# Altium PCB Keyb_ESP32_simple.PcbDoc (part 1 of 2)
Units mm, origin at the board's own origin, x right, y up, seen from the top; angles counter-clockwise.
Board outline 160.13 x 101 mm, 2 copper layers (Top Layer, Bottom Layer), stack 1.181 mm thick; 132 components, 118 nets, 620 pads, 274 vias.
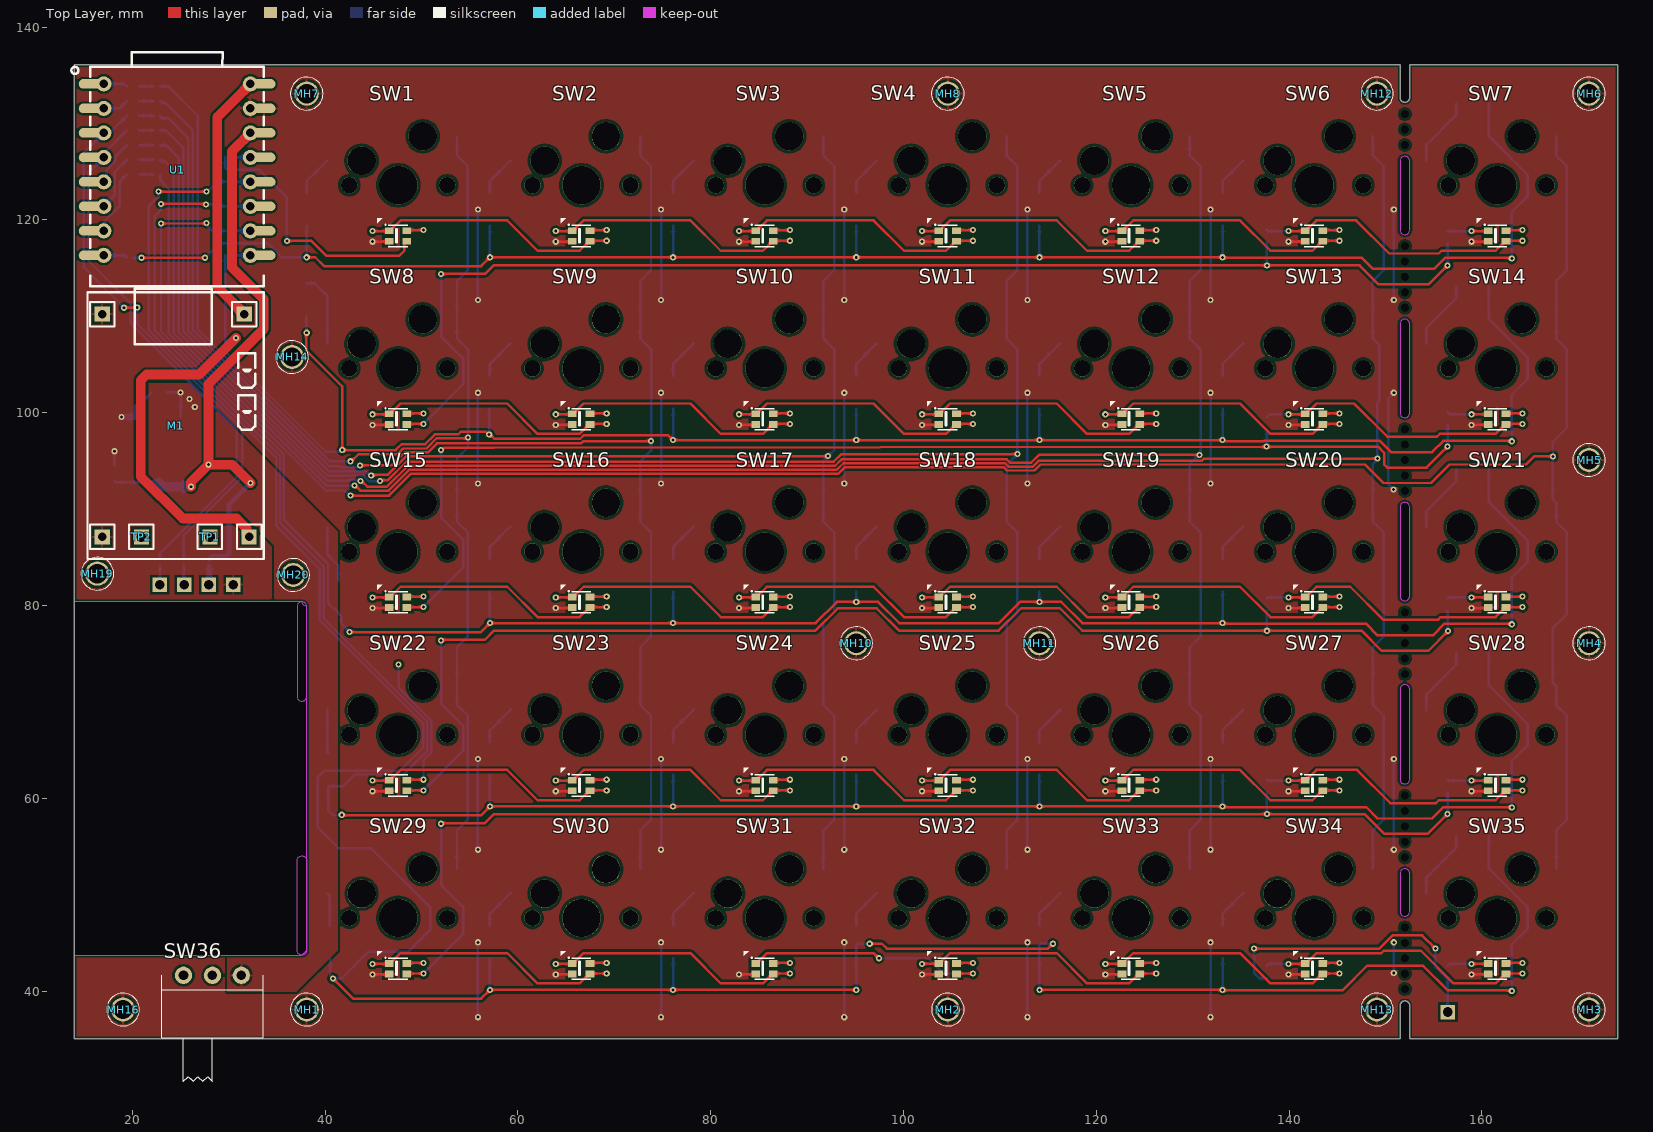
[diagram p0: Top Layer view]
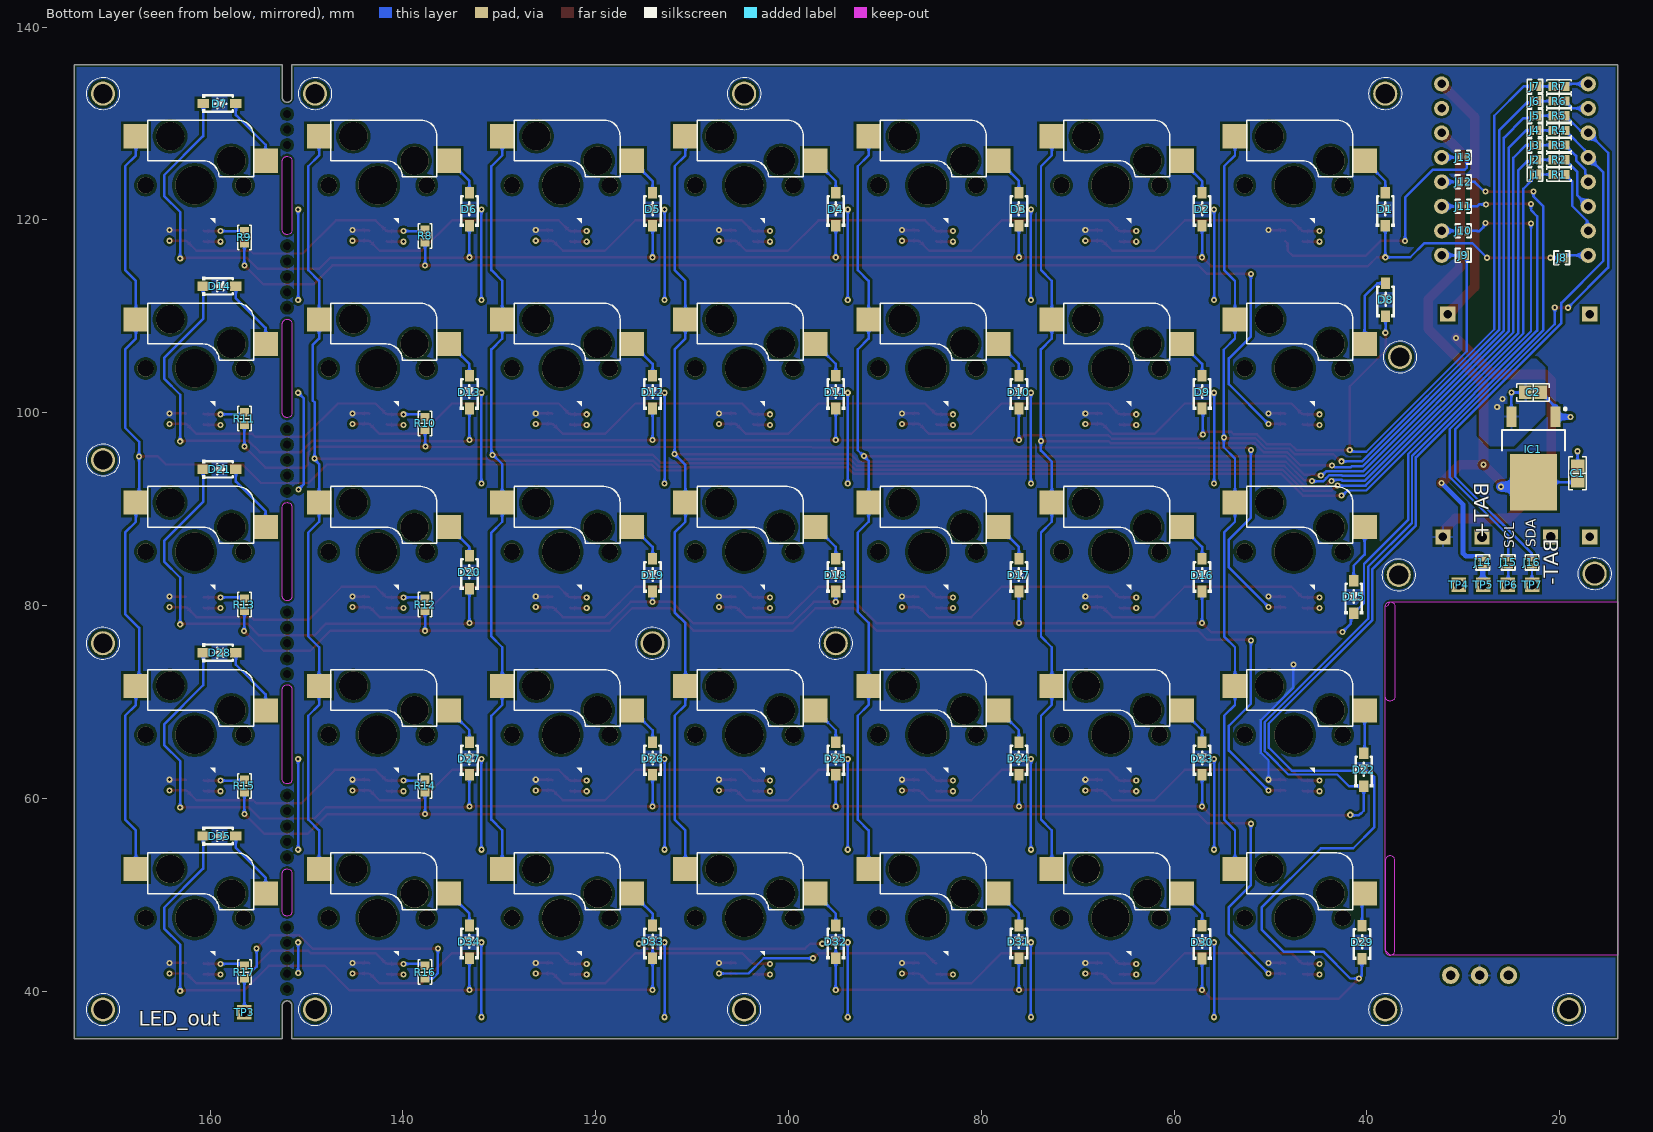
[diagram p1: Bottom Layer view, seen from below]
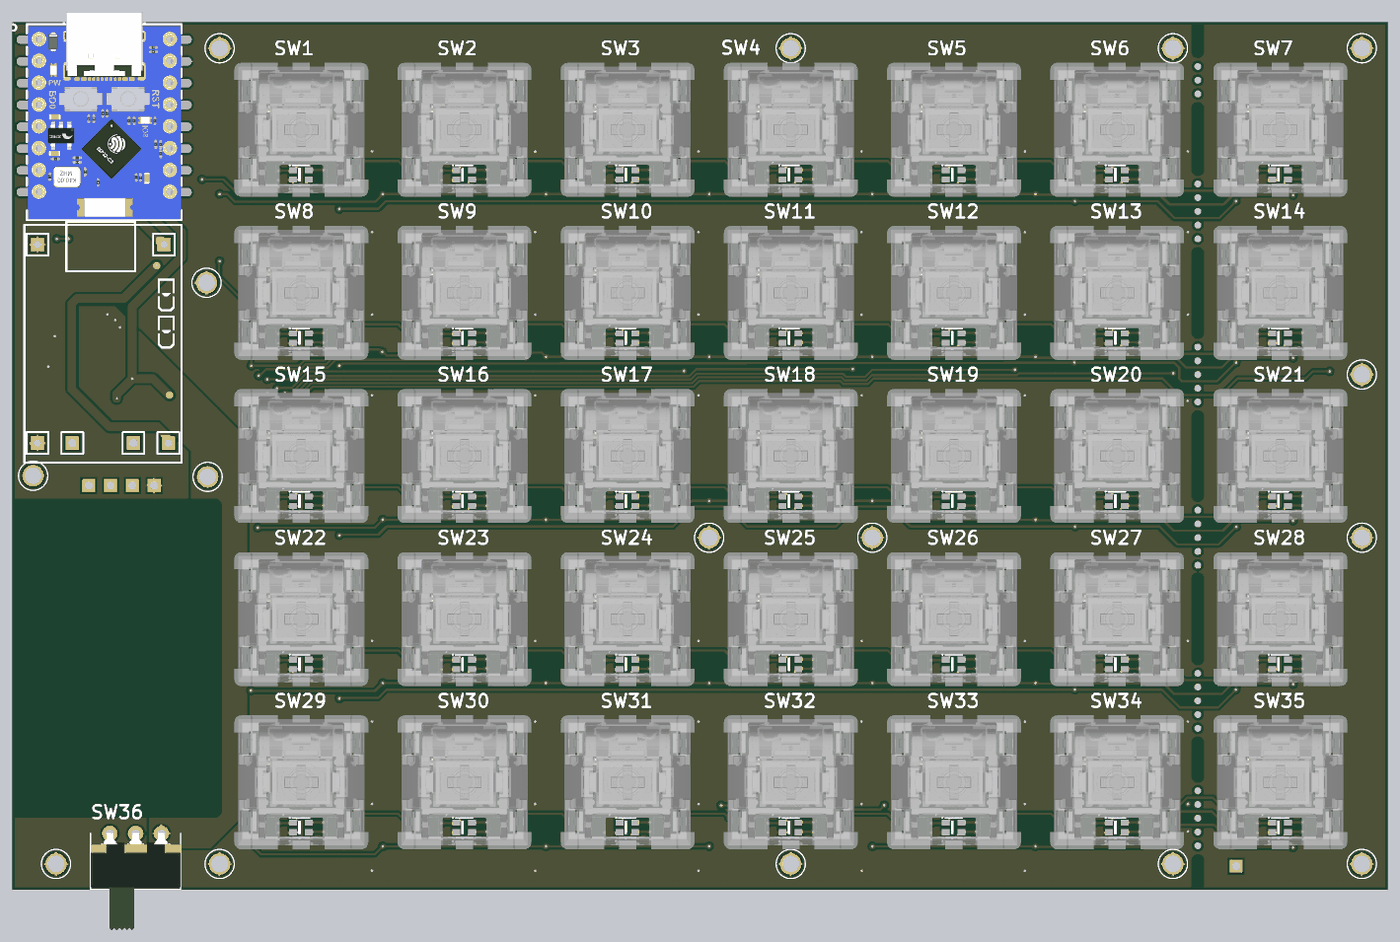
[diagram p3: 3D render of the assembled board from above, using the file's embedded part models]

## Layer stack, top to bottom
Top Solder: solder mask 0.0102, Solder Resist, Dk 3.5
Top Layer: signal copper 0.0356
Dielectric 1: dielectric 1.11, FR-4, Dk 4.8
Bottom Layer: signal copper 0.0356
Bottom Solder: solder mask 0.0102, Solder Resist, Dk 3.5

## Board outline
13.97,35.1 151.5,35.1 151.5,38.5 cw(c152,38.5) 152.5,38.5 152.5,35.1 174.1,35.1 174.1,136.1 152.5,136.1 152.5,132.7 cw(c152,132.7) 151.5,132.7 151.5,136.1 13.97,136.1
cut-out: 37.1,53.556 cw(c37.591,53.556) 37.591,54.047 cw(c37.591,53.538) 38.1,53.538 38.1,44.25 cw(c37.6,44.247) 37.596,43.747 cw(c37.591,44.238) 37.1,44.238 37.1,44.247
cut-out: 37.1,70.576 ccw(c37.591,70.574) 37.591,70.083 ccw(c37.591,70.592) 38.1,70.592 38.1,79.883 ccw(c37.6,79.883) 37.596,80.383 ccw(c37.591,79.892) 37.1,79.892
cut-out: 151.5,99.991 ccw(c151.991,99.991) 151.991,99.5 152,99.5 ccw(c152,100) 152.5,100 152.5,109.2 ccw(c152,109.2) 152,109.7 151.991,109.7 ccw(c151.991,109.209) 151.5,109.209
cut-out: 151.5,80.991 ccw(c151.991,80.991) 151.991,80.5 ccw(c151.991,81.009) 152.5,81.009 152.5,90.2 ccw(c152,90.2) 152,90.7 151.991,90.7 ccw(c151.991,90.209) 151.5,90.209 151.5,90.2
cut-out: 151.5,61.991 ccw(c151.991,61.991) 151.991,61.5 ccw(c151.991,62.009) 152.5,62.009 152.5,71.3 ccw(c152,71.3) 152,71.8 151.991,71.8 ccw(c151.991,71.309) 151.5,71.309 151.5,71.3
cut-out: 151.5,48.291 ccw(c151.991,48.291) 151.991,47.8 ccw(c151.991,48.309) 152.5,48.309 152.5,52.2 ccw(c152,52.2) 152,52.7 151.991,52.7 ccw(c151.991,52.209) 151.5,52.209
cut-out: 151.5,118.968 ccw(c151.991,118.968) 151.991,118.477 ccw(c151.991,118.986) 152.5,118.986 152.5,126.091 ccw(c152,126.091) 152,126.591 151.991,126.591 ccw(c151.991,126.1) 151.5,126.1
cut-out: 38.092,79.886 37.77,80.035 37.587,80.391 13.978,80.383 13.97,80.391 13.97,43.739 37.587,43.739 38.092,44.244

## Design rules (kind name [scope] priority, off if disabled: settings)
BoardOutlineClearance [All] p1: gap=0.254 ignorepadtopadclearanceinfootprint=FALSE except(0: Arc-SplitContinuation Track-SplitContinuation SMDPad-SplitContinuation THPad-SplitContinuation Via-SplitContinuation Fill-SplitContinuation Poly-SplitContinuation Region-SplitContinuation Text-SplitContinuation)
Clearance [All] p1: gap=0.254 ignorepadtopadclearanceinfootprint=FALSE except(0.152: Arc-Arc Arc-Track Arc-THPad Arc-Via Arc-Text Track-Track Track-THPad Track-Via Track-Text SMDPad-SMDPad SMDPad-THPad SMDPad-Via SMDPad-Text THPad-THPad THPad-Via THPad-Text Via-Via Via-Text Fill-Text Poly-Text Region-Text Text-Text; 0.203: Arc-SMDPad Track-SMDPad; 0.305: Arc-Hole Track-Hole SMDPad-Hole THPad-Hole Via-Hole Fill-Hole Poly-Hole Region-Hole Text-Hole)
PolygonConnect [All] p1: thpad.connectstyle=Relief thpad.reliefconductorwidth=0.254 thpad.reliefentries=4 thpad.polygonreliefangle="90 Angle" thpad.airgapwidth=0.254 smdpad.connectstyle=Relief smdpad.reliefconductorwidth=0.254 smdpad.reliefentries=4 smdpad.polygonreliefangle="90 Angle" smdpad.airgapwidth=0.254 via.connectstyle=Direct via.reliefconductorwidth=0.254 via.reliefentries=4 via.polygonreliefangle="90 Angle" via.airgapwidth=0.254
RoutingVias [All] p1: holewidth=0.305 width=0.635 viastyle="Through Hole" minholewidth=0.305 minwidth=0.635 maxholewidth=0.305 maxwidth=0.635
SolderMaskExpansion [All] p1: expansion=0.102 istentingtop=FALSE
Width [All] p1: maxlimit=1.016 minlimit=0.152 preferedwidth=0.152
30 further rules are at their usual default settings.

## Classes and differential pairs
component class Keyb_ESP32_simple: C1 C2 IC1 J1 J2 J3 J4 J5 J6 J7 J8 J9 J10 J11 J12 J13 J14 J15 J16 M1 MH1 MH2 MH3 MH4 MH5 MH6 MH7 MH8 MH10 MH11 MH12 MH13 MH14 MH16 MH19 MH20 R1 R2 R3 R4 R5 R6 R7 SW36 TP1 TP2 TP3 TP4 TP5 TP6 TP7 U1
component class Designator: D1 D2 D3 D4 D5 D6 D7 D8 D9 D10 D11 D12 D13 D14 D15 D16 D17 D18 D19 D20 D21 D22 D23 D24 D25 D26 D27 D28 D29 D30 D31 D32 D33 D34 D35 R8 R9 R10 R11 R12 R13 R14 R15 R16 R17 SW1 SW2 SW3 SW4 SW5 SW6 SW7 SW8 SW9 SW10 SW11 SW12 SW13 SW14 SW15 SW16 SW17 SW18 SW19 SW20 SW21 SW22 SW23 SW24 SW25 SW26 SW27 SW28 SW29 SW30 SW31 SW32 SW33 SW34 SW35

## Components (designator, comment, footprint, x,y, rotation, side; value= is the part's Value field where it differs from the comment)
C1 "10 µF" "CAP 0805_2012" 18.161,93.726 r270 bottom
C2 "1 µF" "CAP 0805_2012" 22.771,102.108 r0 bottom
D1 "1N4148" SOD-123 38.1,121.1 r90 bottom
D2 "1N4148" SOD-123 57.1,121.1 r90 bottom
D3 "1N4148" SOD-123 76.1,121.1 r90 bottom
D4 "1N4148" SOD-123 95.1,121.1 r90 bottom
D5 "1N4148" SOD-123 114.1,121.1 r90 bottom
D6 "1N4148" SOD-123 133.1,121.1 r90 bottom
D7 "1N4148" SOD-123 159.01,132.073 r180 bottom
D8 "1N4148" SOD-123 38.072,111.732 r90 bottom
D9 "1N4148" SOD-123 57.1,102.143 r90 bottom
D10 "1N4148" SOD-123 76.1,102.143 r90 bottom
D11 "1N4148" SOD-123 95.1,102.143 r90 bottom
D12 "1N4148" SOD-123 114.1,102.143 r90 bottom
D13 "1N4148" SOD-123 133.1,102.143 r90 bottom
D14 "1N4148" SOD-123 159.01,113.116 r180 bottom
D15 "1N4148" SOD-123 41.377,80.899 r90 bottom
D16 "1N4148" SOD-123 57.1,83.164 r90 bottom
D17 "1N4148" SOD-123 76.1,83.164 r90 bottom
D18 "1N4148" SOD-123 95.1,83.164 r90 bottom
D19 "1N4148" SOD-123 114.1,83.164 r90 bottom
D20 "1N4148" SOD-123 133.1,83.464 r90 bottom
D21 "1N4148" SOD-123 159.01,94.137 r180 bottom
D22 "1N4148" SOD-123 40.335,62.967 r90 bottom
D23 "1N4148" SOD-123 57.1,64.142 r90 bottom
D24 "1N4148" SOD-123 76.1,64.142 r90 bottom
D25 "1N4148" SOD-123 95.1,64.142 r90 bottom
D26 "1N4148" SOD-123 114.1,64.142 r90 bottom
D27 "1N4148" SOD-123 133.1,64.142 r90 bottom
D28 "1N4148" SOD-123 159.01,75.115 r180 bottom
D29 "1N4148" SOD-123 40.513,45.085 r90 bottom
D30 "1N4148" SOD-123 57.1,45.1 r90 bottom
D31 "1N4148" SOD-123 76.1,45.123 r90 bottom
D32 "1N4148" SOD-123 95.1,45.123 r90 bottom
D33 "1N4148" SOD-123 114.1,45.123 r90 bottom
D34 "1N4148" SOD-123 133.1,45.123 r90 bottom
D35 "1N4148" SOD-123 159.01,56.096 r180 bottom
IC1 "LD1117DT33TR" TO228P972X240-3N 22.733,95.25 r270 bottom
J1 "" "CON: JUMPER x1" 22.925,124.714 r180 bottom
J2 "" "CON: JUMPER x1" 22.925,126.238 r180 bottom
J3 "" "CON: JUMPER x1" 22.925,127.762 r180 bottom
J4 "" "CON: JUMPER x1" 22.925,129.286 r180 bottom
J5 "" "CON: JUMPER x1" 22.925,130.81 r180 bottom
J6 "" "CON: JUMPER x1" 22.925,132.334 r180 bottom
J7 "" "CON: JUMPER x1" 22.925,133.858 r180 bottom
J8 "" "CON: JUMPER x1" 20.131,116.078 r180 bottom
J9 "" "CON: JUMPER x1" 29.653,116.332 r0 bottom
J10 "" "CON: JUMPER x1" 29.653,118.872 r0 bottom
J11 "" "CON: JUMPER x1" 29.653,121.412 r0 bottom
J12 "" "CON: JUMPER x1" 29.653,123.952 r0 bottom
J13 "" "CON: JUMPER x1" 29.653,126.492 r0 bottom
J14 "" "CON: JUMPER x1" 27.991,84.125 r90 bottom
J15 "" "CON: JUMPER x1" 25.349,84.125 r90 bottom
J16 "" "CON: JUMPER x1" 22.885,84.125 r90 bottom
M1 "TP4056_MODULE" TP4056_MODULE 16.891,110.236 r270 top
MH1 "MountingHole" Hole_2.5mm 38.1,38.1 r0 top
MH2 "MountingHole" Hole_2.5mm 104.602,38.1 r0 top
MH3 "MountingHole" Hole_2.5mm 171.1,38.1 r0 top
MH4 "MountingHole" Hole_2.5mm 171.1,76.1 r0 top
MH5 "MountingHole" Hole_2.5mm 171.1,95.1 r0 top
MH6 "MountingHole" Hole_2.5mm 171.1,133.1 r0 top
MH7 "MountingHole" Hole_2.5mm 38.1,133.1 r0 top
MH8 "MountingHole" Hole_2.5mm 104.598,133.1 r0 top
MH10 "MountingHole" Hole_2.5mm 95.095,76.096 r0 top
MH11 "MountingHole" Hole_2.5mm 114.094,76.1 r0 top
MH12 "MountingHole" Hole_2.5mm 149.1,133.1 r0 top
MH13 "MountingHole" Hole_2.5mm 149.1,38.1 r0 top
MH14 "MountingHole" Hole_2.5mm 36.576,105.791 r0 top
MH16 "MountingHole" Hole_2.5mm 19.05,38.1 r0 top
MH19 "MountingHole" Hole_2.5mm 16.383,83.312 r270 top
MH20 "MountingHole" Hole_2.5mm 36.703,83.185 r270 top
R1 "4.7 kOhms" "RES 0603_1608" 20.081,124.714 r180 bottom
R2 "4.7 kOhms" "RES 0603_1608" 20.081,126.238 r180 bottom
R3 "4.7 kOhms" "RES 0603_1608" 20.081,127.762 r180 bottom
R4 "4.7 kOhms" "RES 0603_1608" 20.081,129.286 r180 bottom
R5 "4.7 kOhms" "RES 0603_1608" 20.081,130.81 r180 bottom
R6 "4.7 kOhms" "RES 0603_1608" 20.081,132.334 r180 bottom
R7 "4.7 kOhms" "RES 0603_1608" 20.081,133.858 r180 bottom
R8 "Value" "RES 0603_1608" 137.691,118.336 r270 bottom
R9 "Value" "RES 0603_1608" 156.436,118.194 r270 bottom
R10 "Value" "RES 0603_1608" 137.691,98.89 r270 bottom
R11 "Value" "RES 0603_1608" 156.436,99.398 r270 bottom
R12 "Value" "RES 0603_1608" 137.691,80.094 r270 bottom
R13 "Value" "RES 0603_1608" 156.436,80.094 r270 bottom
R14 "Value" "RES 0603_1608" 137.691,61.298 r270 bottom
R15 "Value" "RES 0603_1608" 156.436,61.298 r270 bottom
R16 "Value" "RES 0603_1608" 137.691,41.994 r270 bottom
R17 "Value" "RES 0603_1608" 156.436,41.994 r270 bottom
SW1 "Kailh" KAILH_MX_SOCKET_WS2812 47.6,123.6 r0 top
SW2 "Kailh" KAILH_MX_SOCKET_WS2812 66.6,123.6 r0 top
SW3 "Kailh" KAILH_MX_SOCKET_WS2812 85.6,123.6 r0 top
SW4 "Kailh" KAILH_MX_SOCKET_WS2812 104.6,123.6 r0 top
SW5 "Kailh" KAILH_MX_SOCKET_WS2812 123.6,123.6 r0 top
SW6 "Kailh" KAILH_MX_SOCKET_WS2812 142.6,123.6 r0 top
SW7 "Kailh" KAILH_MX_SOCKET_WS2812 161.6,123.6 r0 top
SW8 "Kailh" KAILH_MX_SOCKET_WS2812 47.6,104.6 r0 top
SW9 "Kailh" KAILH_MX_SOCKET_WS2812 66.6,104.6 r0 top
SW10 "Kailh" KAILH_MX_SOCKET_WS2812 85.6,104.6 r0 top
SW11 "Kailh" KAILH_MX_SOCKET_WS2812 104.6,104.6 r0 top
SW12 "Kailh" KAILH_MX_SOCKET_WS2812 123.6,104.6 r0 top
SW13 "Kailh" KAILH_MX_SOCKET_WS2812 142.6,104.6 r0 top
SW14 "Kailh" KAILH_MX_SOCKET_WS2812 161.6,104.6 r0 top
SW15 "Kailh" KAILH_MX_SOCKET_WS2812 47.6,85.6 r0 top
SW16 "Kailh" KAILH_MX_SOCKET_WS2812 66.6,85.6 r0 top
SW17 "Kailh" KAILH_MX_SOCKET_WS2812 85.6,85.6 r0 top
SW18 "Kailh" KAILH_MX_SOCKET_WS2812 104.6,85.6 r0 top
SW19 "Kailh" KAILH_MX_SOCKET_WS2812 123.6,85.6 r0 top
SW20 "Kailh" KAILH_MX_SOCKET_WS2812 142.6,85.6 r0 top
SW21 "Kailh" KAILH_MX_SOCKET_WS2812 161.6,85.6 r0 top
SW22 "Kailh" KAILH_MX_SOCKET_WS2812 47.6,66.6 r0 top
SW23 "Kailh" KAILH_MX_SOCKET_WS2812 66.6,66.6 r0 top
SW24 "Kailh" KAILH_MX_SOCKET_WS2812 85.6,66.6 r0 top
SW25 "Kailh" KAILH_MX_SOCKET_WS2812 104.6,66.6 r0 top
SW26 "Kailh" KAILH_MX_SOCKET_WS2812 123.6,66.6 r0 top
SW27 "Kailh" KAILH_MX_SOCKET_WS2812 142.6,66.6 r0 top
SW28 "Kailh" KAILH_MX_SOCKET_WS2812 161.6,66.6 r0 top
SW29 "Kailh" KAILH_MX_SOCKET_WS2812 47.6,47.6 r0 top
SW30 "Kailh" KAILH_MX_SOCKET_WS2812 66.6,47.6 r0 top
SW31 "Kailh" KAILH_MX_SOCKET_WS2812 85.6,47.6 r0 top
SW32 "Kailh" KAILH_MX_SOCKET_WS2812 104.6,47.6 r0 top
SW33 "Kailh" KAILH_MX_SOCKET_WS2812 123.6,47.6 r0 top
SW34 "Kailh" KAILH_MX_SOCKET_WS2812 142.6,47.6 r0 top
SW35 "Kailh" KAILH_MX_SOCKET_WS2812 161.6,47.6 r0 top
SW36 "RockerSwitch_3mm" SLIDE_SW_BIG 28.321,41.656 r180 top
TP1 "BAT+" TESTPOINT_PAD 28.067,87.122 r180 top
TP2 "BAT-" TESTPOINT_PAD 20.955,87.122 r270 top
TP3 "LED_out" TESTPOINT_PAD 156.464,37.846 r180 bottom
TP4 "GND" TESTPOINT_PAD 30.48,82.169 r270 bottom
TP5 "VDD" TESTPOINT_PAD 27.94,82.169 r270 bottom
TP6 "SCL" TESTPOINT_PAD 25.4,82.169 r270 bottom
TP7 "SDA" TESTPOINT_PAD 22.86,82.169 r270 bottom
U1 "ESP32-C3_SuperMini" ESP32-C3_SUPER_MINI 15.655,134.112 r0 top

## Footprints (in the part's own frame and the unit in brackets; to place one, negate y for a bottom-side part, rotate by r counter-clockwise, add the part's x,y. Pads: shape width x height; smd on the part's side, far side on the other; paste and mask are expansions set on the pad)
"CAP 0805_2012" [mm] "Chip Capacitor, 2-Leads, Body 2.00x1.20mm, IPC Medium Density"
  rect 1.3x1.4 smd: 1(-0.8,0) 2(0.8,0)
  silkscreen extent -1.7,-0.9 1.7,0.9, body extent -1,-0.64 1,0.64, height 1.26
"CON: JUMPER x1" [mm]
  rect 0.5x1 smd: 1(0,0) 2(0.7,0)
  silkscreen extent -0.45,-0.7 1.15,0.7
ESP32-C3_SUPER_MINI [mil]
  oval 94.49x39.37 smd paste+0 mask+2: 1(0,0) 2(0,-100) 3(0,-200) 4(0,-300) 5(0,-400) 6(0,-500) 7(0,-600) 8(0,-700) 9(708.66,-700) 10(708.66,-600) 11(708.66,-500) 12(708.66,-400) 13(708.66,-300) 14(708.66,-200) 15(708.66,-100) 16(708.66,0)
  round 62 hole 35 paste-99999 mask+4: 1(55,0) 2(55,-100) 3(55,-200) 4(55,-300) 5(55,-400) 6(55,-500) 7(55,-600) 8(55,-700) 9(653.66,-700) 10(653.66,-600) 11(653.66,-500) 12(653.66,-400) 13(653.66,-300) 14(653.66,-200) 15(653.66,-100) 16(653.66,0)
  silkscreen extent -77,-827 709,130, body extent 5,-824 706,124, height 174
Hole_2.5mm [mm]
  round 2.5 hole 2: 0(0,0)
  body extent -0.5,-0.5 0.5,0.5, height 0.5
KAILH_MX_SOCKET_WS2812 [mm]
  rect 0.9x0.7 smd paste+0 mask+0.051: 1(-0.942,-4.707) 2(-0.942,-5.807) 3(0.888,-5.807) 4(0.888,-4.707)
  rect 2.55x2.5 smd far side paste+0 mask+0.102: S1(-7.36,2.54) S2(6.09,5.08)
  round 1.7 hole 1.7 unplated paste-2539.97: ""(-5.08,0) ""(5.08,0)
  round 2.95 hole 2.95 unplated paste-2539.97: ""(-3.81,2.54) ""(2.54,5.08)
  round 3.98 hole 3.98 unplated paste-2539.97: ""(0,0)
  silkscreen extent -2.16,-6.36 0.97,-3.43, body extent -7.9,-7.79 7.81,7.81, height 15.49
"RES 0603_1608" [mm] "Chip Resistor, 2-Leads, Body 1.60x0.80mm, IPC Medium Density"
  rect 0.85x0.95 smd: 1(-0.65,0) 2(0.65,0)
  silkscreen extent -1.27,-0.7 1.27,0.7, body extent -0.8,-0.4 0.8,0.4, height 0.45
SLIDE_SW_BIG [mm] "My slide switch from chip dip L-KLS7-SS-12F19-G5"
  round 1.8 hole 1: 1(-3,0) 2(0,0) 3(3,0)
  silkscreen extent -5.25,0 5.25,11, body extent -5.25,-0.25 5.25,11.25, height 5.5
SOD-123 [mm]
  rect 1.2x0.95 smd: 1(-1.7,0) 2(1.7,0)
  silkscreen extent -1.81,-0.98 1.35,0.98
TESTPOINT_PAD [mm]
  rect 1.5x1.5 hole 1: 1(0,0)
TO228P972X240-3N [mm]
  rect 2.1x1 smd: 1(-4.35,2.28) 3(-4.35,-2.28)
  rect 5.85x4.9 smd: 4(2.45,0)
  silkscreen extent -5.27,-3.25 -0.85,3.42, body extent -4.97,-3.3 4.56,3.3, height 2.3
TP4056_MODULE [mil]
  rect 62x62 hole 35 paste-99999 mask+4: B+(910,440) B-(910,160) GND(0,0) OUT+(910,600) OUT-(910,0) USB(0,580)
  silkscreen extent -104,-60 1000,660

## Part data
C1: library part C0805C106K8PAC7800, "CAP CER 10UF 10V X5R 0805", Device Package="0805 (2012 Metric)", Manufacturer=KEMET, Operating Temperature="-55°C ~ 85°C", Supplier Part Number 1=399-C0805C106K8PAC7800CT-ND, Temperature Coefficient=X5R, Tolerance=±10%, Voltage - Rated=10V, Applications="Bypass, Decoupling", Capacitance="10 µF", ComponentLink1Description=Datasheet, ComponentLink1URL=https://connect.kemet.com:7667/gateway/IntelliData-ComponentDocumentation/1.0/download/datasheet/C0805C106K8PACTU, ComponentLink2Description="DigiKey Link", ComponentLink2URL=https://www.digikey.com/en/products/detail/kemet/C0805C106K8PAC7800/1090830, LastUpdated="9/14/2022 7:51:56 AM", Lifecycle Status=Active, Minimum Order=1, Mounting Type="Surface Mount, MLCC", Package / Case="0805 (2012 Metric)", Packaging=TapeAndReel, Part Number=C0805C106K8PAC7800, Part Status=Active, PartId=44790, Price=0.02, Series="SMD Comm X5R", Size / Dimension="0.079\" L x 0.049\" W (2.00mm x 1.25mm)", Supplier 1=DigiKey, Thickness (Max)="0.055\" (1.40mm)"
C2: library part C0805C105K4RAC7800, "CAP CER 1UF 16V X7R 0805", Device Package="0805 (2012 Metric)", Manufacturer=KEMET, Operating Temperature="-55°C ~ 125°C", Supplier Part Number 1=399-C0805C105K4RAC7800CT-ND, Temperature Coefficient=X7R, Tolerance=±10%, Voltage - Rated=16V, Applications="Bypass, Decoupling", Capacitance="1 µF", ComponentLink1Description=Datasheet, ComponentLink1URL=https://api.kemet.com/component-edge/download/datasheet/C0805C105K4RACTU.pdf, ComponentLink2Description="DigiKey Link", ComponentLink2URL=https://www.digikey.com/en/products/detail/kemet/C0805C105K4RAC7800/416047, LastUpdated="9/19/2022 1:03:30 PM", Lifecycle Status=Active, Minimum Order=1, Mounting Type="Surface Mount, MLCC", Package / Case="0805 (2012 Metric)", Packaging=TapeAndReel, Part Number=C0805C105K4RAC7800, Part Status=Active, PartId=32075, Price=0.01, Series="SMD Comm X7R", Size / Dimension="0.079\" L x 0.049\" W (2.00mm x 1.25mm)", Supplier 1=DigiKey, Thickness (Max)="0.039\" (1.00mm)"
IC1: "Integrated Circuit", Manufacturer_Name=STMicroelectronics, Mouser Part Number=511-LD1117DT33-TR, Arrow Part Number=LD1117DT33TR, Arrow Price/Stock=https://www.arrow.com/en/products/ld1117dt33tr/stmicroelectronics?region=nac, Datasheet Link=http://www.st.com/web/en/resource/technical/document/datasheet/CD00000544.pdf, Height=2.4mm, Manufacturer_Part_Number=LD1117DT33TR, Mouser Price/Stock=https://www.mouser.co.uk/ProductDetail/STMicroelectronics/LD1117DT33TR?qs=4JhUBQGAOSd4P5jVYGxp2g%3D%3D
J1 J2 J3 J4 J5 J6 J7 J8 J9 J10 J11 J12 J13 J14 J15 J16: library part Jumper_single, CommentText="\"Перемычка\""
R1 R2 R3 R4 R5 R6 R7: library part ERJ-U03J472V, "RES 4.7K OHM 5% 1/10W 0603 SMD", Device Package="0603 (1608 Metric)", Manufacturer="Panasonic Electronic Components", Operating Temperature="-55°C ~ 155°C", Power (Watts)="0.1W, 1/10W", Ratings=AEC-Q200, Supplier Device Package=0603, Supplier Part Number 1=10-ERJ-U03J472VCT-ND, Temperature Coefficient=±200ppm/°C, Tolerance=±5%, ComponentLink1Description=Datasheet, ComponentLink1URL=https://industrial.panasonic.com/cdbs/www-data/pdf/RDP0000/AOA0000C334.pdf, ComponentLink2Description="DigiKey Link", ComponentLink2URL=https://www.digikey.com/en/products/detail/panasonic-electronic-components/ERJ-U03J472V/11631906, Composition="Thick Film", Features="Anti-Sulfur, Automotive AEC-Q200", Height - Seated (Max)="0.022\" (0.55mm)", LastUpdated="2/9/2024 8:41:20 PM", Lifecycle Status=Active, Minimum Order=1, Number of Terminations=2, Package / Case="0603 (1608 Metric)", Packaging=TapeAndReel, Part Number=ERJ-U03J472V, Part Status=Active, PartId=62126, Price=0.01, Resistance="4.7 kOhms", Series=ERJ-U03, Size / Dimension="0.063\" L x 0.031\" W (1.60mm x 0.80mm)", Supplier 1=DigiKey
R8 R9 R10 R11 R12 R13 R14 R15 R16 R17: library part RCA06030000ZSEA, "RES SMD 0 OHM JUMPER 1/10W 0603", Device Package="0603 (1608 Metric)", Manufacturer="Vishay Dale", Operating Temperature="-55°C ~ 155°C", Power (Watts)="0.1W, 1/10W", Ratings=AEC-Q200, Supplier Device Package=0603, Supplier Part Number 1=541-2192-1-ND, Tolerance=Jumper, ComponentLink1Description=Datasheet, ComponentLink1URL=http://www.vishay.com/docs/20037/rcae3.pdf, ComponentLink2Description="DigiKey Link", ComponentLink2URL=http://digikey.com/product-detail/en/vishay-dale/RCA06030000ZSEA/541-2192-1-ND/4946845, Composition="Thick Film", Features="Anti-Sulfur, Automotive AEC-Q200", Height - Seated (Max)="0.020\" (0.50mm)", LastUpdated="9/2/2020 1:10:23 AM", Lifecycle Status=Active, Minimum Order=1, Number of Terminations=2, Package / Case="0603 (1608 Metric)", Packaging=TapeAndReel, Part Number=RCA06030000ZSEA, Part Status=Active, PartId=5740, Price=0.01, Series=RCA, Size / Dimension="0.061\" L x 0.033\" W (1.55mm x 0.85mm)", Supplier 1=DigiKey
SW1 SW2 SW3 SW4 SW5 SW6 SW7 SW8 SW9 SW10 SW11 SW12 SW13 SW14 SW15 SW16 SW17 SW18 SW19 SW20 SW21 SW22 SW23 SW24 SW25 SW26 SW27 SW28 SW29 SW30 SW31 SW32 SW33 SW34 SW35: library part Kailh_hotswap_RGB_WS2812, "Kailh keyboard switch, hotswap rgb ws2812 in 2020 package, dual-side hotswap options + low prifile variant"
SW36: "Slide switch L-KLS7-SS-12F19-G5"
TP1 TP2 TP3 TP4 TP5 TP6 TP7: library part TestPoint

## Free pads (board coordinates)
  round 0 hole 0.8: 7(152,40.223) 7(152,41.823) 7(152,43.423) 7(152,45.023) 7(152,46.623) 7(152,53.9) 7(152,55.5) 7(152,57.1) 7(152,58.7) 7(152,60.3) 7(152,72.9) 7(152,74.5) 7(152,76.1) 7(152,77.7) 7(152,79.3) 7(152,91.9) 7(152,93.5) 7(152,95.1) 7(152,96.7) 7(152,98.3) 7(152,110.9) 7(152,112.5) 7(152,114.1) 7(152,115.7) 7(152,117.3) 7(152,127.777) 7(152,129.377) 7(152,130.977)

## Via types
v1: diameter 0.635, hole 0.305, Top Layer to Bottom Layer, tented both sides, 272 vias
v2: diameter 0.635, hole 0.305, Top Layer to Bottom Layer, 2 vias

## Nets (pads, with @x,y where several pads share a name; then routed paths per layer and width w, separated by ;. In a path a pad name is that pad's centre, name@x,y a point inside that pad or via, vN(x,y) a via of type N, cw(c..) or ccw(c..) an arc to the next point about the centre after c; other vN are vias at no path point)
3V3: C1.2 IC1.4 J14.2 U1.14 | length 65.8
  Top Layer w1.016: v1(26.111,92.329) 26.111,92.812 v1(27.915,94.615) ; v2(32.258,92.71) 30.353,94.615 v1(27.915,94.615) ; U1.14@32.258,129.032 30.353,127.127 30.353,115.062 33.655,111.76 33.655,108.712 27.915,102.972 v1(27.915,94.615)
  Bottom Layer w0.254: C1.2@18.161,92.926 18.287,92.8 IC1.4@22.733,92.8
  Bottom Layer w0.508: J14.2@27.995,84.829 28.28,85.114 28.28,85.117 29.725,85.117 30.023,85.415 30.023,90.475 v2(32.258,92.71)
  Bottom Layer w1.016: IC1.4@22.733,92.8 23.204,92.329 v1(26.111,92.329)
B+: M1.B+ TP1.1
B-: M1.B- TP2.1
col1: R1.2 U1.7 | length 6.9
  Bottom Layer w0.254: U1.7@17.052,118.872 17.161,118.981 17.161,119.923 18.716,121.477 18.716,123.999 19.146,124.43 19.196,124.43 19.431,124.664 R1.2@19.431,124.714
col2: R2.2 U1.6 | length 5.8
  Bottom Layer w0.254: U1.6@17.052,121.412 18.182,122.542 18.182,124.989 19.146,125.954 19.196,125.954 19.431,126.188 R2.2@19.431,126.238
col3: R3.2 U1.5 | length 4.8
  Bottom Layer w0.254: U1.5@17.052,123.952 17.28,124.18 17.28,124.704 17.348,124.772 17.348,125.19 18.313,126.155 18.313,126.644 19.146,127.478 19.196,127.478 19.431,127.712 R3.2@19.431,127.762
col4: J16.2 R4.2 U1.4 | length 55.8
  Bottom Layer w0.254: R4.2@19.431,129.286 19.431,129.236 19.196,129.001 19.146,129.001 17.424,127.279 17.424,127.187 17.052,126.815 U1.4@17.052,126.492 15.474,124.914 15.474,115.768 19.842,111.399 19.842,109.301 30.861,98.282 30.861,93.361 22.885,85.385 J16.2@22.885,84.825
col5: J15.2 R5.2 U1.3 | length 58.3
  Top Layer w0.254: v1(19.152,110.896) 19.162,110.907 v1(20.523,110.907)
  Bottom Layer w0.254: v1(19.152,110.896) 14.986,115.062 14.986,126.966 U1.3@17.052,129.032 17.28,129.26 17.881,129.26 19.146,130.525 19.196,130.525 19.431,130.76 R5.2@19.431,130.81 ; v1(20.523,110.907) 20.523,109.195 31.409,98.309 31.409,93.334 25.349,87.274 J15.2@25.349,84.825
col6: R6.2 U1.2 | length 2.7
  Bottom Layer w0.254: U1.2@17.052,131.572 18.669,131.572 19.146,132.05 19.196,132.05 19.431,132.284 R6.2@19.431,132.334
col7: R7.2 U1.1 | length 2.5
  Bottom Layer w0.254: U1.1@17.052,134.112 19.196,134.112 19.431,133.877 R7.2@19.431,133.858
GND: C1.1 C2.1 IC1.1 M1.GND M1.OUT- MH1.0 MH2.0 MH3.0 MH4.0 MH5.0 MH6.0 MH7.0 MH8.0 MH10.0 MH11.0 MH12.0 MH13.0 MH14.0 MH16.0 SW1.2 SW2.2 SW3.2 SW4.2 SW5.2 SW6.2 SW7.2 SW8.2 SW9.2 SW10.2 SW11.2 SW12.2 SW13.2 SW14.2 SW15.2 SW16.2 SW17.2 SW18.2 SW19.2 SW20.2 SW21.2 SW22.2 SW23.2 SW24.2 SW25.2 SW26.2 SW27.2 SW28.2 SW29.2 SW30.2 SW31.2 SW32.2 SW33.2 SW34.2 SW35.2 TP4.1 U1.15 | length 100.1
  Top Layer w0.254: v1(44.93,41.744) 46.609,41.744 SW29.2@46.658,41.793 ; v1(44.93,60.744) 46.609,60.744 SW22.2@46.658,60.793 ; v1(44.93,79.744) 46.609,79.744 SW15.2@46.658,79.793 ; v1(44.93,98.744) 46.609,98.744 SW8.2@46.658,98.793 ; v1(44.93,117.744) 46.609,117.744 SW1.2@46.658,117.793 ; v1(63.93,41.744) 65.609,41.744 SW30.2@65.658,41.793 ; v1(63.93,60.744) 65.609,60.744 SW23.2@65.658,60.793 ; v1(63.93,79.744) 65.609,79.744 SW16.2@65.658,79.793 ; v1(63.93,98.744) 65.609,98.744 SW9.2@65.658,98.793 ; v1(63.93,117.744) 65.609,117.744 SW2.2@65.658,117.793 ; v1(82.93,41.744) 84.609,41.744 SW31.2@84.658,41.793 ; v1(82.93,60.744) 84.609,60.744 SW24.2@84.658,60.793 ; v1(82.93,79.744) 84.609,79.744 SW17.2@84.658,79.793 ; v1(82.93,98.744) 84.609,98.744 SW10.2@84.658,98.793 ; v1(82.93,117.744) 84.609,117.744 SW3.2@84.658,117.793 ; v1(101.93,41.744) 103.609,41.744 SW32.2@103.658,41.793 ; v1(101.93,60.744) 103.609,60.744 SW25.2@103.658,60.793 ; v1(101.93,79.744) 103.609,79.744 SW18.2@103.658,79.793 ; v1(101.93,98.744) 103.609,98.744 SW11.2@103.658,98.793 ; v1(101.93,117.744) 103.609,117.744 SW4.2@103.658,117.793 ; v1(120.93,41.744) 122.609,41.744 SW33.2@122.658,41.793 ; v1(120.93,60.744) 122.609,60.744 SW26.2@122.658,60.793 ; v1(120.93,79.744) 122.609,79.744 SW19.2@122.658,79.793 ; v1(120.93,98.744) 122.609,98.744 SW12.2@122.658,98.793 ; v1(120.93,117.744) 122.609,117.744 SW5.2@122.658,117.793 ; v1(139.93,41.744) 141.609,41.744 SW34.2@141.658,41.793 ; v1(139.93,60.744) 141.609,60.744 SW27.2@141.658,60.793 ; v1(139.93,79.744) 141.609,79.744 SW20.2@141.658,79.793 ; v1(139.93,98.744) 141.609,98.744 SW13.2@141.658,98.793 ; v1(139.93,117.744) 141.609,117.744 SW6.2@141.658,117.793 ; v1(158.93,41.744) 160.609,41.744 SW35.2@160.658,41.793 ; v1(158.93,60.744) 160.609,60.744 SW28.2@160.658,60.793 ; v1(158.93,79.744) 160.609,79.744 SW21.2@160.658,79.793 ; v1(158.93,98.744) 160.609,98.744 SW14.2@160.658,98.793 ; v1(158.93,117.744) 160.609,117.744 SW7.2@160.658,117.793
  Bottom Layer w0.254: C1.1@18.161,94.526 v1(18.161,96.012) ; IC1.1@20.452,100.589 21.398,101.535 21.448,101.535 21.971,102.058 C2.1@21.971,102.108 ; v1(150.825,92.037) 150.29,92.572 150.29,101.518 v1(150.852,102.08) ; v1(150.848,41.882) 150.852,41.886 v1(150.852,45.08) ; v1(150.852,54.682) v1(150.852,64.08) ; v1(150.852,111.682) v1(150.852,121.08)
  Bottom Layer w0.635: v1(18.905,99.569) 20.27,99.569 20.453,99.752 IC1.1@20.453,99.874 ; IC1.1@20.458,99.605 IC1.1@20.458,100.583
  other v1: 55.852,37.31 74.852,37.31 93.852,37.31 112.852,37.31 131.852,37.31 55.852,45.08 74.852,45.08 93.852,45.08 112.852,45.08 131.852,45.08 55.852,54.682 74.852,54.682 93.852,54.682 112.852,54.682 131.852,54.682 55.852,64.08 74.852,64.08 93.852,64.08 112.852,64.08 131.852,64.08 55.852,92.682 74.852,92.682 93.852,92.682 112.852,92.682 131.852,92.682 55.852,102.08 74.852,102.08 93.852,102.08 112.852,102.08 131.852,102.08 55.852,111.682 74.852,111.682 93.852,111.682 112.852,111.682 131.852,111.682 55.852,121.08 74.852,121.08 93.852,121.08 112.852,121.08 131.852,121.08
led_in: J13.2 U1.13 | length 1.9
  Bottom Layer w0.254: J13.2@30.353,126.492 U1.13@32.258,126.492
led_out: R16.2 R17.2 TP3.1 | length 31.2
  Top Layer w0.254: v1(136.37,44.422) 149.35,44.422 150.732,45.804 153.784,45.804 v1(155.166,44.422)
  Bottom Layer w0.254: v1(136.37,44.422) 136.37,41.882 136.908,41.344 R16.2@137.691,41.344 ; v1(155.166,44.422) 155.166,42.547 155.824,41.889 155.891,41.889 156.088,41.692 156.088,41.642 156.386,41.344 R17.2@156.436,41.344 156.436,37.874 TP3.1@156.464,37.846
NetC2_2: C2.2 IC1.3 SW36.1 | length 4
  Bottom Layer w0.254: C2.2@23.571,102.108 v1(25.019,102.108) 25.019,99.606 IC1.3@25.013,99.6
  other v1: 26.492,100.584 25.933,101.448
NetD1_1: D1.1 D2.1 D3.1 D4.1 D5.1 D6.1 D7.1 J8.1 | length 184.1
  Top Layer w0.254: v1(20.955,116.078) v1(27.559,116.078) ; v1(38.1,116.126) 38.986,116.126 39.901,115.212 56.186,115.212 v1(57.1,116.126) v1(76.1,116.126) v1(95.1,116.126) v1(114.1,116.126) v1(133.1,116.126) 133.164,116.063 147.537,116.063 148.681,114.919 155.019,114.919 156.163,116.063 163.027,116.063 v1(163.091,115.999)
  Bottom Layer w0.254: J8.1@20.131,116.078 v1(20.955,116.078) ; v1(27.559,116.078) 29.083,117.602 34.036,117.602 35.512,116.126 v1(38.1,116.126) D1.1@38.1,119.4 ; v1(57.1,116.126) D2.1@57.1,119.4 ; v1(76.1,116.126) D3.1@76.1,119.4 ; v1(95.1,116.126) D4.1@95.1,119.4 ; v1(114.1,116.126) D5.1@114.1,119.4 ; v1(133.1,116.126) D6.1@133.1,119.4 ; D7.1@160.71,132.073 160.71,128.693 164.767,124.635 164.767,122.502 163.091,120.825 v1(163.091,115.999)
NetD1_2: D1.2 SW1.S1 | length 4.2
  Bottom Layer w0.254: D1.2@38.1,122.8 38.1,124.025 40.215,126.14 SW1.S1@40.24,126.14
NetD2_2: D2.2 SW2.S1 | length 4.2
  Bottom Layer w0.254: D2.2@57.1,122.8 57.1,124.025 59.215,126.14 SW2.S1@59.24,126.14
NetD3_2: D3.2 SW3.S1 | length 4.2
  Bottom Layer w0.254: D3.2@76.1,122.8 76.1,124.025 78.215,126.14 SW3.S1@78.24,126.14
NetD4_2: D4.2 SW4.S1 | length 4.2
  Bottom Layer w0.254: D4.2@95.1,122.8 95.1,124.025 97.215,126.14 SW4.S1@97.24,126.14
NetD5_2: D5.2 SW5.S1 | length 4.2
  Bottom Layer w0.254: D5.2@114.1,122.8 114.1,124.025 116.215,126.14 SW5.S1@116.24,126.14
NetD6_2: D6.2 SW6.S1 | length 4.2
  Bottom Layer w0.254: D6.2@133.1,122.8 133.1,124.025 135.215,126.14 SW6.S1@135.24,126.14
NetD7_2: D7.2 SW7.S1 | length 7.2
  Bottom Layer w0.254: SW7.S1@154.24,126.14 154.24,127.799 157.31,130.868 D7.2@157.31,132.073
NetD8_1: D8.1 D9.1 D10.1 D11.1 D12.1 D13.1 D14.1 J9.1 | length 199.8
  Top Layer w0.254: v1(38.1,108.3) 38.038,108.238 38.038,106.488 41.788,102.738 v1(41.788,96.125) 47.323,96.125 47.94,96.742 50.381,96.742 51.401,97.762 53.82,97.762 54.074,98.016 56.689,98.016 56.957,97.748 v1(57.028,97.748) 57.129,97.748 57.573,97.305 66.474,97.305 66.827,97.657 75.6,97.657 75.997,97.26 75.997,97.169 v1(76.1,97.169) v1(95.1,97.169) v1(114.1,97.169) v1(133.1,97.169) 133.173,97.096 133.385,97.096 133.439,97.042 137.346,97.042 137.393,97.089 149.411,97.089 150.581,95.919 154.819,95.919 155.989,97.089 163.044,97.089 v1(163.091,97.042)
  Bottom Layer w0.254: J9.1@29.653,116.332 29.653,106.387 40.08,95.96 v1@41.604,95.96 ; D8.1@38.072,110.032 38.072,108.328 v1(38.1,108.3) ; v1(57.028,97.748) 57.024,97.753 57.024,100.367 D9.1@57.1,100.443 ; v1(76.1,97.169) D10.1@76.1,100.443 ; v1(95.1,97.169) D11.1@95.1,100.443 ; v1(114.1,97.169) D12.1@114.1,100.443 ; v1(133.1,97.169) D13.1@133.1,100.443 ; D14.1@160.71,113.116 160.71,109.736 164.767,105.678 164.767,103.545 163.091,101.868 v1(163.091,97.042)
NetD8_2: D8.2 SW8.S1 | length 7.7
  Bottom Layer w0.254: D8.2@38.072,113.432 38.912,113.432 40.24,112.104 SW8.S1@40.24,107.14
NetD9_2: D9.2 SW9.S1 | length 4.2
  Bottom Layer w0.254: D9.2@57.1,103.843 57.1,105.068 59.215,107.183 SW9.S1@59.24,107.183
NetD10_2: D10.2 SW10.S1 | length 4.2
  Bottom Layer w0.254: D10.2@76.1,103.843 76.1,105.068 78.215,107.183 SW10.S1@78.24,107.183
NetD11_2: D11.2 SW11.S1 | length 4.2
  Bottom Layer w0.254: D11.2@95.1,103.843 95.1,105.068 97.215,107.183 SW11.S1@97.24,107.183
NetD12_2: D12.2 SW12.S1 | length 4.2
  Bottom Layer w0.254: D12.2@114.1,103.843 114.1,105.068 116.215,107.183 SW12.S1@116.24,107.183
NetD13_2: D13.2 SW13.S1 | length 4.2
  Bottom Layer w0.254: D13.2@133.1,103.843 133.1,105.068 135.215,107.183 SW13.S1@135.24,107.183
NetD14_2: D14.2 SW14.S1 | length 7.2
  Bottom Layer w0.254: SW14.S1@154.24,107.14 154.24,108.799 157.31,111.868 D14.2@157.31,113.073
NetD15_1: D15.1 D16.1 D17.1 D18.1 D19.1 D20.1 D21.1 J10.1 | length 213.8
  Top Layer w0.254: v1(22.987,119.634) 27.654,119.634 v1(27.699,119.678) ; v1(42.54,77.254) 56.163,77.254 v1(57.1,78.191) v1(76.1,78.191) 90.891,78.191 93.086,80.386 v1(95.099,80.386) 97.358,80.386 99.553,78.191 109.891,78.191 112.086,80.386 v1(114.1,80.386) 116.358,80.386 118.553,78.191 v1(133.1,78.191) 133.164,78.127 147.973,78.127 149.181,76.919 154.919,76.919 156.127,78.127 163.027,78.127 v1(163.091,78.064)
  Bottom Layer w0.254: v1(22.987,119.634) 22.987,108.455 35.738,95.704 35.738,88.895 40.31,84.323 40.31,80.266 40.904,79.672 41.029,79.672 41.377,79.324 D15.1@41.377,79.199 41.667,78.909 41.667,78.127 v1(42.54,77.254) ; v1(27.699,119.678) 27.772,119.605 27.772,119.421 28.343,118.85 28.553,118.85 28.575,118.872 J10.1@29.653,118.872 ; v1(57.1,78.191) D16.1@57.1,81.464 ; v1(76.1,78.191) D17.1@76.1,81.464 ; v1(95.099,80.386) 95.099,81.463 D18.1@95.1,81.464 ; v1(114.1,80.386) D19.1@114.1,81.464 ; v1(133.1,78.191) D20.1@133.1,81.464 ; D21.1@160.71,94.137 160.71,90.757 164.767,86.7 164.767,84.566 163.091,82.89 v1(163.091,78.064)
NetD15_2: D15.2 SW15.S1 | length 6
  Bottom Layer w0.254: SW15.S1@40.24,88.14 40.24,85.287 41.377,84.15 D15.2@41.377,82.599
NetD16_2: D16.2 SW16.S1 | length 4.2
  Bottom Layer w0.254: D16.2@57.1,84.864 57.1,86.089 59.215,88.204 SW16.S1@59.24,88.204
NetD17_2: D17.2 SW17.S1 | length 4.2
  Bottom Layer w0.254: D17.2@76.1,84.864 76.1,86.089 78.215,88.204 SW17.S1@78.24,88.204
NetD18_2: D18.2 SW18.S1 | length 4.2
  Bottom Layer w0.254: D18.2@95.1,84.864 95.1,86.089 97.215,88.204 SW18.S1@97.24,88.204
NetD19_2: D19.2 SW19.S1 | length 4.2
  Bottom Layer w0.254: D19.2@114.1,84.864 114.1,86.089 116.215,88.204 SW19.S1@116.24,88.204
NetD20_2: D20.2 SW20.S1 | length 4.2
  Bottom Layer w0.254: D20.2@133.1,84.864 133.1,86.089 135.215,88.204 SW20.S1@135.24,88.204
NetD21_2: D21.2 SW21.S1 | length 7.2
  Bottom Layer w0.254: SW21.S1@154.24,88.14 154.24,89.799 157.31,92.868 D21.2@157.31,94.073
NetD22_1: D22.1 D23.1 D24.1 D25.1 D26.1 D27.1 D28.1 J11.1 | length 249
  Top Layer w0.254: v1(22.987,121.666) 27.603,121.666 v1(27.653,121.616) ; v1(41.735,58.302) 41.794,58.243 56.175,58.243 v1(57.1,59.168) v1(76.1,59.168) v1(95.1,59.168) v1(114.1,59.168) v1(133.1,59.168) 133.164,59.104 147.996,59.104 149.181,57.919 154.819,57.919 156.004,59.104 163.027,59.104 v1(163.091,59.041)
  Bottom Layer w0.254: v1(22.987,121.666) 22.987,121.024 22.352,120.389 22.352,108.516 35.332,95.536 35.332,88.576 39.882,84.025 39.882,78.638 50.597,67.924 50.597,64.913 50.284,64.6 48.168,62.484 43.078,62.484 41.861,61.267 D22.1@40.335,61.267 40.335,58.726 40.661,58.4 40.722,58.4 40.88,58.243 41.675,58.243 v1(41.735,58.302) ; v1(27.653,121.616) 28.371,121.616 28.575,121.412 J11.1@29.653,121.412 ; v1(57.1,59.168) D23.1@57.1,62.442 ; v1(76.1,59.168) D24.1@76.1,62.442 ; v1(95.1,59.168) D25.1@95.1,62.442 ; v1(114.1,59.168) D26.1@114.1,62.442 ; v1(133.1,59.168) D27.1@133.1,62.442 ; D28.1@160.71,75.115 160.71,71.734 164.767,67.677 164.767,65.543 163.091,63.867 v1(163.091,59.041)
NetD22_2: D22.2 SW22.S1 | length 4.5
  Bottom Layer w0.254: SW22.S1@40.215,69.182 SW22.S1@40.24,69.182 ; SW22.S1@40.24,69.14 40.24,64.762 D22.2@40.335,64.667
NetD23_2: D23.2 SW23.S1 | length 4.2
  Bottom Layer w0.254: D23.2@57.1,65.842 57.1,67.067 59.215,69.182 SW23.S1@59.24,69.182
NetD24_2: D24.2 SW24.S1 | length 4.2
  Bottom Layer w0.254: D24.2@76.1,65.842 76.1,67.067 78.215,69.182 SW24.S1@78.24,69.182
NetD25_2: D25.2 SW25.S1 | length 4.2
  Bottom Layer w0.254: D25.2@95.1,65.842 95.1,67.067 97.215,69.182 SW25.S1@97.24,69.182
NetD26_2: D26.2 SW26.S1 | length 4.2
  Bottom Layer w0.254: D26.2@114.1,65.842 114.1,67.067 116.215,69.182 SW26.S1@116.24,69.182
NetD27_2: D27.2 SW27.S1 | length 4.2
  Bottom Layer w0.254: D27.2@133.1,65.842 133.1,67.067 135.215,69.182 SW27.S1@135.24,69.182
NetD28_2: D28.2 SW28.S1 | length 7.2
  Bottom Layer w0.254: SW28.S1@154.24,69.14 154.24,70.799 157.31,73.868 D28.2@157.31,75.073
NetD29_1: D29.1 D30.1 D31.1 D32.1 D33.1 D34.1 D35.1 J12.1 | length 293
  Top Layer w0.254: v1(22.733,122.936) 27.671,122.936 v1(27.699,122.963) ; v1(40.815,41.324) 42.904,39.235 56.186,39.235 v1(57.1,40.149) v1(76.1,40.149) v1(95.1,40.149) ; v1(96.492,44.93) 97.762,44.93 98.27,44.422 114.984,44.422 v1(115.492,44.93) ; v1(114.1,40.149) v1(133.1,40.149) 133.164,40.086 145.514,40.086 148.07,42.642 153.898,42.642 156.454,40.086 163.027,40.086 v1(163.091,40.022)
  Bottom Layer w0.254: v1(22.733,122.936) 22.733,122.446 21.699,121.412 21.699,108.594 34.925,95.367 34.925,88.305 39.476,83.754 39.476,78.47 50.19,67.755 50.19,65.278 47.803,62.89 39.929,62.89 39.268,62.23 39.268,56.998 41.427,54.839 44.78,54.839 50.927,48.692 50.927,46.406 48.641,44.12 44.526,44.12 41.73,41.324 v1(40.815,41.324) 40.815,41.387 40.538,41.663 40.538,43.36 D29.1@40.513,43.385 ; v1(27.699,122.963) 27.802,122.963 27.971,123.132 28.009,123.132 28.829,123.952 J12.1@29.653,123.952 ; v1(57.1,40.149) D30.1@57.1,43.4 ; v1(76.1,40.149) D31.1@76.1,43.423 ; v1(95.1,40.149) D32.1@95.1,43.423 95.1,44.676 95.1,44.781 95.249,44.93 v1(96.492,44.93) ; v1(114.1,40.149) D33.1@114.1,43.423 114.1,44.676 114.1,44.781 114.249,44.93 v1(115.492,44.93) ; v1(133.1,40.149) D34.1@133.1,43.423 ; D35.1@160.71,56.096 160.71,52.716 164.767,48.658 164.767,46.524 163.091,44.848 v1(163.091,40.022)
NetD29_2: D29.2 SW29.S1 | length 3.5
  Bottom Layer w0.254: SW29.S1@40.24,50.14 40.513,49.867 D29.2@40.513,46.785
NetD30_2: D30.2 SW30.S1 | length 4.2
  Bottom Layer w0.254: D30.2@57.1,46.823 57.1,48.048 59.215,50.163 SW30.S1@59.24,50.163
NetD31_2: D31.2 SW31.S1 | length 4.2
  Bottom Layer w0.254: D31.2@76.1,46.823 76.1,48.048 78.215,50.163 SW31.S1@78.24,50.163
NetD32_2: D32.2 SW32.S1 | length 4.2
  Bottom Layer w0.254: D32.2@95.1,46.823 95.1,48.048 97.215,50.163 SW32.S1@97.24,50.163
NetD33_2: D33.2 SW33.S1 | length 4.2
  Bottom Layer w0.254: D33.2@114.1,46.823 114.1,48.048 116.215,50.163 SW33.S1@116.24,50.163
NetD34_2: D34.2 SW34.S1 | length 4.2
  Bottom Layer w0.254: D34.2@133.1,46.823 133.1,48.048 135.215,50.163 SW34.S1@135.24,50.163
NetD35_2: D35.2 SW35.S1 | length 7.2
  Bottom Layer w0.254: SW35.S1@154.24,50.14 154.24,51.799 157.31,54.868 D35.2@157.31,56.073
NetJ1_1: J1.1 SW7.S2 SW14.S2 SW21.S2 SW28.S2 SW35.S2 | length 251.2
  Top Layer w0.254: v1(42.644,91.412) 46.641,91.412 48.927,93.698 93.252,93.698 93.912,94.358 110.376,94.358 110.723,94.011 113.585,94.011 114.209,94.636 147.864,94.636 149.781,92.719 154.719,92.719 156.636,94.636 164.564,94.636 165.404,95.476 v1(167.358,95.476)
  Bottom Layer w0.254: J1.1@22.925,124.714 22.925,124.087 23.786,123.226 23.786,108.231 40.08,91.937 42.016,91.937 42.541,91.412 v1(42.644,91.412) ; v1@167.358,95.469 167.358,91.012 SW21.S2@167.69,90.68 167.69,88.696 168.811,87.575 168.811,79.149 167.358,77.696 167.358,72.012 SW28.S2@167.69,71.68 167.69,69.696 168.811,68.575 168.811,57.805 167.69,56.685 SW35.S2@167.69,52.68 ; v1(167.358,95.476) 167.358,97 168.811,98.453 168.811,106.575 167.69,107.696 SW14.S2@167.69,109.68 167.69,113.685 168.811,114.805 168.811,125.575 167.69,126.696 SW7.S2@167.69,128.68
NetJ1_2: J1.2 R1.1 | length 1.5
  Bottom Layer w0.254: R1.1@20.731,124.714 J1.2@22.225,124.714
NetJ2_1: J2.1 SW6.S2 SW13.S2 SW20.S2 SW27.S2 SW34.S2 | length 231.4
  Top Layer w0.254: v1(43.065,92.439) 43.168,92.439 43.674,91.933 46.587,91.933 48.759,94.104 93.084,94.104 93.744,94.765 110.545,94.765 110.892,94.418 113.416,94.418 114.041,95.042 130.956,95.042 131.159,95.245 v1(149.149,95.245)
  Bottom Layer w0.254: J2.1@22.925,126.238 22.925,126.195 23.048,126.072 23.407,126.072 24.298,125.181 24.298,108.294 40.142,92.45 43.054,92.45 v1(43.065,92.439) ; SW34.S2@148.69,52.68 148.69,56.685 149.811,57.805 149.811,68.575 148.69,69.696 SW27.S2@148.69,71.68 148.69,75.685 149.811,76.805 149.811,87.575 148.69,88.696 SW20.S2@148.69,90.68 148.69,94.685 149.149,95.143 v1(149.149,95.245) ; SW6.S2@148.69,128.68 148.69,126.696 149.811,125.575 149.811,114.805 148.69,113.685 SW13.S2@148.69,109.68 148.69,107.696 149.352,107.034 149.352,101.293 149.149,101.089 149.149,95.347 v1@149.25,95.245
NetJ2_2: J2.2 R2.1 | length 1.5
  Bottom Layer w0.254: R2.1@20.731,126.238 J2.2@22.225,126.238